# Altium PCB PCB_Interface_Board_7500-0428.PcbDoc (part 4 of 5)
Units mil, origin at the board's own origin, x right, y up, seen from the top; angles counter-clockwise.
Board outline 3850 x 4150 mil, 4 copper layers (Top Layer 1, GND+Signal, PWR+Signal, Bottom Layer 1), stack 62.449 mil thick; 247 components, 137 nets, 1675 pads, 241 vias.
Unrouted connection lines stored in the file: 122.
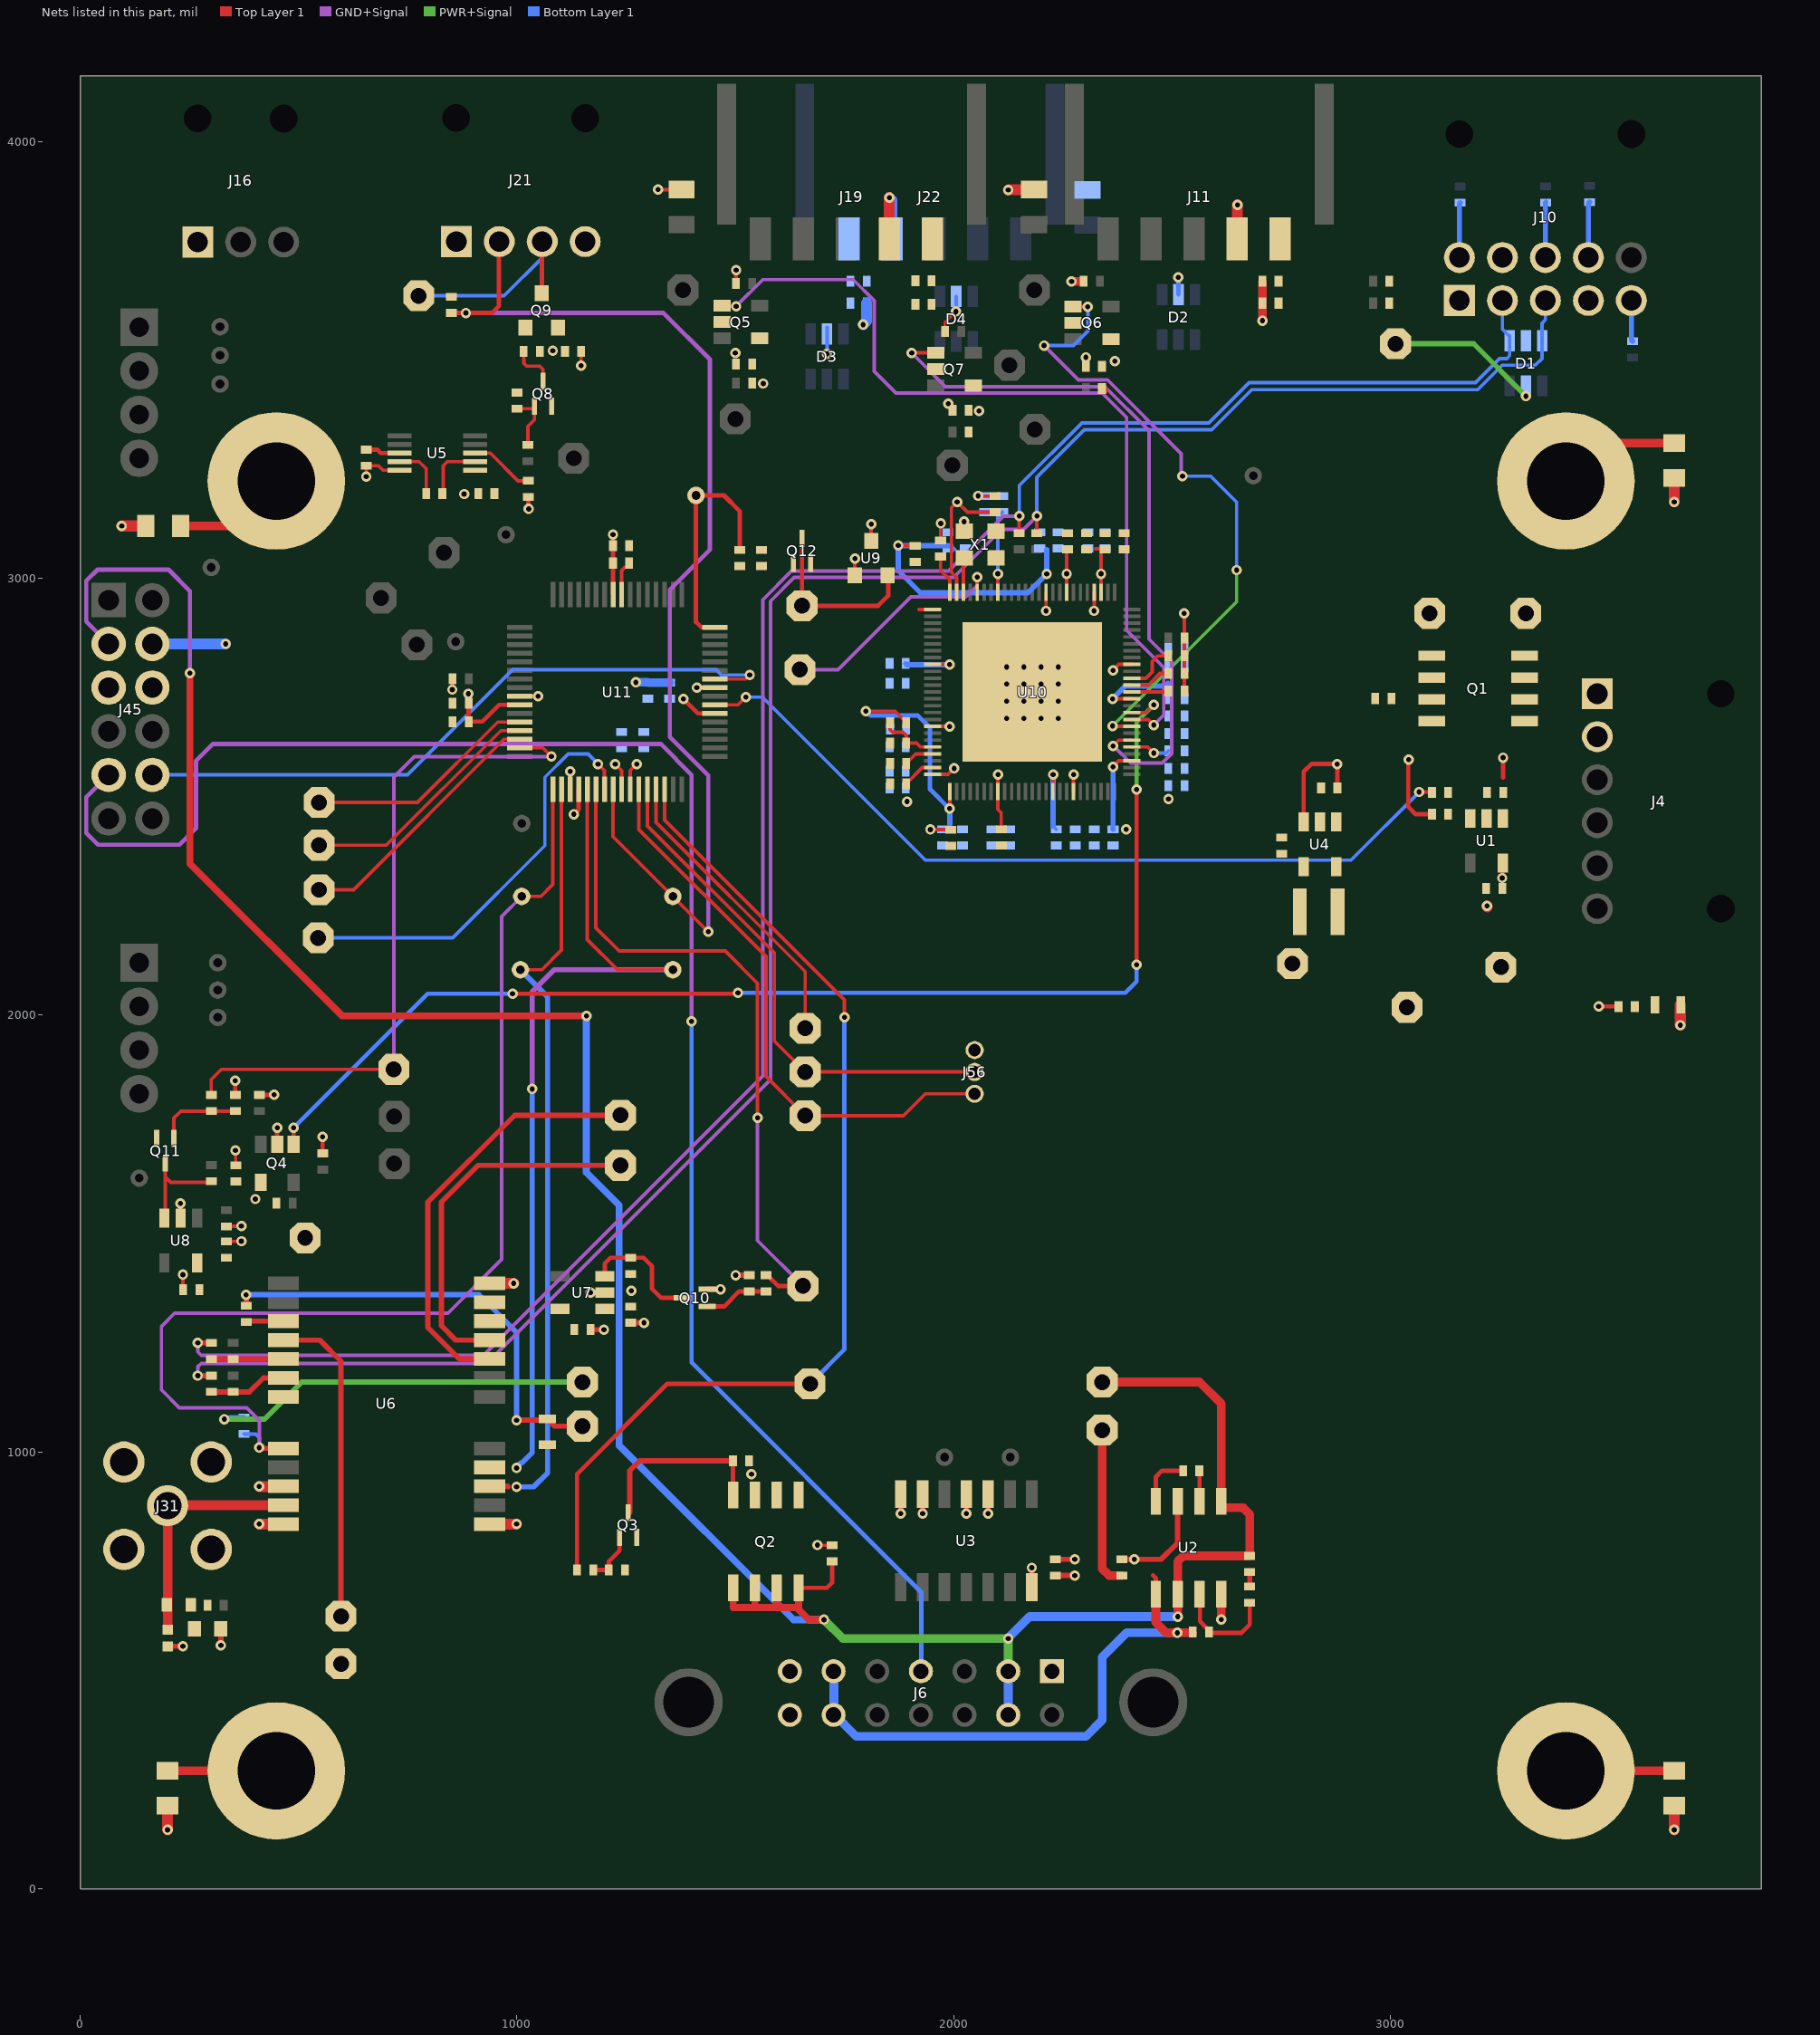
[diagram p4: the nets of this part, all layers, seen from the top]

## Via types
v1: diameter 23.62, hole 11.81, Top Layer 1 to Bottom Layer 1, tented top, 214 vias
v2: diameter 23.62, hole 11.81, Top Layer 1 to Bottom Layer 1, 27 vias

## Nets (pads, with @x,y where several pads share a name; then routed paths per layer and width w, separated by ;. In a path a pad name is that pad's centre, name@x,y a point inside that pad or via, vN(x,y) a via of type N, cw(c..) or ccw(c..) an arc to the next point about the centre after c; other vN are vias at no path point) (continued)
NetJ52_1: (continued)
  Top Layer 1 w8: J52.1@547,2287 625.74,2287 970.47,2631.73 U11.14@1006.77,2631.73
NetL1_1: L1.1 U4.5
NetLED1_1: LED1.1 R3.1
NetMH1_MH: MH1.MH R58.2 | length 248
  Top Layer 1 w20: R58.2@200,270 MH1.MH@448,270
NetMH2_MH: MH2.MH R59.2 | length 248
  Top Layer 1 w20: MH2.MH@3402,270 R59.2@3650,270
NetMH3_MH: MH3.MH R60.2 | length 284
  Top Layer 1 w20: MH3.MH@3402,3223 3489,3310 R60.2@3650,3310
NetMH4_MH: MH4.MH R61.2 | length 261.7
  Top Layer 1 w20: R61.2@230,3120 346,3120 MH4.MH@449,3223
NetQ2_4: Q2.4 Q3.3 R1.1 | length 440.3
  Top Layer 1 w10: Q3.3@1254.72,873.19 1255.72,873.19 1254.81,872.29 Q3.3@1254.81,861.19 ; Q3.3@1255.72,875.68 Q3.3@1258.5,878.46 ; R1.1@1494.6,980 1494.8,979.8 1494.8,900.2 Q2.4@1496,899
  Top Layer 1 w12: Q3.3@1258.5,861.5 1258.5,957.5 1281,980 R1.1@1494.6,980
NetQ3_1: Q3.1 R8.2 R10.2 | length 120.5
  Top Layer 1 w10: R8.2@1174.6,730 R10.2@1210.39,730 1210.39,749.39 1235.13,774.13 Q3.1@1235.13,804.5
NetQ8_1: Q8.1 R25.2 R26.2 | length 138.1
  Top Layer 1 w8: R26.2@1000,3388.35 1033.98,3388.35 Q8.1@1040.13,3394.5 1040.13,3363.13 1025,3348 R25.2@1025,3305.35
NetQ8_3: Q8.3 Q9.1 R23.1 | length 104.8
  Top Layer 1 w8: R23.1@1015.39,3520 1015.39,3492.61 1022,3486 1052,3486 1059.81,3478.19 Q8.3@1059.81,3451.19
NetQ10_1: Q10.1 R33.2 R35.2 | length 148.8
  Top Layer 1 w10: Q10.1@1435.5,1333.13 1474.13,1333.13 1508.61,1367.61 R35.2@1531.81,1367.61 R33.2@1570,1367.61
NetQ10_3: Q10.3 R29.1 U7.3 | length 280.5
  Top Layer 1 w10: U7.3@1201,1402.4 1201,1431 1214.61,1444.61 R29.1@1260,1444.61 1290.39,1444.61 1309,1426 1309,1374 1330.18,1352.82 Q10.3@1378.81,1352.82
NetQ11_1: Q11.1 R34.2 R36.2 | length 193.6
  Top Layer 1 w8: Q11.1@214.37,1718 214.37,1764.37 230.4,1780.4 R34.2@300,1780.4 R36.2@355,1780.4
NetQ11_3: Q11.3 R30.1 U8.3 | length 237.4
  Top Layer 1 w8: U8.3@192.6,1535.18 194.68,1537.27 194.68,1630 ; Q11.3@194.68,1661.31 194.68,1630 ; R30.1@300,1617.61 207.08,1617.61 194.68,1630
NetQ12_1: Q12.1 R45.2 R46.2
NetR2_1: R2.1 R7.2 | length 33
  Top Layer 1 w12: R7.2@2678,692.01 R2.1@2678,725.01
NetR5_2: R5.2 R6.2 U1.3
NetR7_1: R7.1 R9.2 U2.7 | length 237.1
  Top Layer 1 w10: U2.7@2563,674.7 2564,673.7 2564,612.14 R9.2@2580.13,596.01 ; R9.2@2584.6,586 2659,586 2678,605 R7.1@2678,655.01
NetR20_2: R20.2 U5.3 | length 147.7
  Top Layer 1 w8: U5.3@904.61,3287 939.03,3286.98 1002.6,3223.4 R20.2@1026,3223.4
NetR37_1: R37.1 R40.1 U6.6 | length 178.2
  Top Layer 1 w12: R40.1@300,1137.61 R37.1@350,1137.61 387.61,1137.61 419.46,1169.46 U6.6@465,1169.46
NetR38_1: R38.1 R41.1 U6.5 | length 165
  Top Layer 1 w12: R41.1@300,1212.77 U6.5@465,1212.77
NetR39_1: R39.1 U6.3 | length 85.7
  Top Layer 1 w12: R39.1@380,1297.61 381.78,1299.39 U6.3@465,1299.39
NetR44_1: R44.1 U10.100 | length 90.6
  Top Layer 1 w8: R44.1@1970,3049.85 1970,3017.79 1991.02,2996.76 U10.100@1991.02,2968
NetR47_1: R47.1 U10.65 | length 118.6
  Top Layer 1 w8: U10.65@2408,2771.5 2440.28,2771.5 2454.39,2785.61 2454.39,2809.39 2467.6,2822.6 R47.1@2491.5,2822.6
NetR48_1: R48.1 U10.64 | length 94.5
  Top Layer 1 w8: U10.64@2408,2755.75 2445.75,2755.75 2472.21,2782.21 R48.1@2491.5,2782.21
NetR49_1: R49.1 U10.63 | length 84.2
  Top Layer 1 w8: U10.63@2408,2740 2489.69,2740 R49.1@2491.5,2741.81
NetR53_1: R53.1 R55.2 U10.21 | length 140.4
  Top Layer 1 w8: R53.1@1854.5,2670 1854.5,2653.5 1860,2648 1884,2648 1891.5,2640.5 R55.2@1891.5,2623.33 1891.83,2623 1915,2623 1923.98,2614.02 U10.21@1952,2614.02
NetR54_2: R54.2 U10.22 | length 69.4
  Top Layer 1 w8: R54.2@1891.5,2576.67 1913.1,2598.27 U10.22@1952,2598.27
NetR56_2: R56.2 U10.24 | length 75.7
  Top Layer 1 w8: R56.2@1891.5,2530 1928.27,2566.77 U10.24@1952,2566.77
PC_USB2_HOST_DM: D1.1 J10.2 R41.2 R50.2 | length 4858.6
  Top Layer 1 w8: R50.2@2150,3103.5 v1@2150,3141.99
  Top Layer 1 w12: v1(269.19,1249.61) R41.2@300,1249.61
  GND+Signal w8: v1(269.19,1249.61) 269.19,1229.02 277,1221.21 923.46,1221.21 1562.79,1860.54 1562.79,2951 1628.79,3017 1988,3017 2113.5,3142.5 v1(2150.51,3142.5)
  Bottom Layer 1 w8: v1(2150.51,3142.5) 2150.51,3212.73 2293.79,3356 2584.37,3356 2676.37,3448 3194.79,3448 3249.79,3503 3266.25,3503 3273,3509.75 3273,3555 3272,3555 3256.57,3570.43 J10.2@3256.57,3636.15
PC_USB2_HOST_DP: D1.3 J10.3 R40.2 R51.2 | length 4953.7
  Top Layer 1 w8: R51.2@2190,3103.5 v1@2190,3141.99
  Top Layer 1 w12: v1(269.19,1174.61) R40.2@300,1174.61
  GND+Signal w8: v1(269.19,1174.61) 269.19,1195.19 277,1203 931,1203 1581,1853 1581,2948 1635,3002 2000,3002 2110,3112 2160.01,3112 v1(2190.51,3142.5)
  Bottom Layer 1 w8: v1(2190.51,3142.5) 2190.51,3231.51 2299,3340 2591,3340 2683,3432 3200,3432 3256,3488 3332,3488 3347,3503 3347,3584 3355,3592 J10.3@3355,3636.15
PC_VBUS: D1.5 J10.1 J74.1 R11.1 | length 348.1
  PWR+Signal w12: J74.1@3012,3537 3190.63,3537 v1(3310.48,3417.15)
PIC_RA1: J61.1 U11.23 | length 980.7
  Top Layer 1 w8: v1(1185.63,2575) 1200.47,2560.16 U11.23@1200.47,2516.77
  Bottom Layer 1 w8: J61.1@545,2177 853,2177 1064,2388 1064,2544.74 1117.26,2598 1162.63,2598 v1(1185.63,2575)
PIC_RA4: J56.2 J63.1 U11.28 | length 1184.3
  Top Layer 1 w8: U11.28@1298.9,2516.77 1298.9,2433.26 1589.68,2142.48 1589.68,1940.32 J63.1@1660,1870 J56.2@2048,1870
PIC_RA5: J56.1 J64.1 U11.27 | length 1313.2
  Top Layer 1 w8: U11.27@1279.21,2516.77 1279.21,2425.11 1570,2134.32 1570,1860 J64.1@1660,1770 1885,1770 1935,1820 J56.1@2048,1820
PIC_RC1: J65.1 U11.29 | length 688.2
  Top Layer 1 w8: U11.29@1318.58,2516.77 1318.58,2441.42 1660,2100 J65.1@1660,1970
PRT_CTL1: Q4.1 U10.60 | length 2814.5
  Top Layer 1 w8: U10.60@2408,2692.76 2440.62,2692.76 v1(2458.34,2710.48)
  Top Layer 1 w10: Q4.1@488.4,1704.29 v1(488.4,1742) ; v1(990,2049) 1504,2049 v1(1506,2051) ; v2(2419,2115.5) v2(2419,2516.81)
  PWR+Signal w10: v2(2419,2516.81) 2419,2671.13 v1(2458.34,2710.48)
  Bottom Layer 1 w10: v1(488.4,1742) 795.4,2049 v1(990,2049) ; v1(1506,2051) 2393,2051 2419,2077 v2(2419,2115.5)
PRT_CTL2: Q6.1 U10.58 | length 1497.2
  Top Layer 1 w8: Q6.1@2273.71,3622.4 2307.6,3622.4 2308,3622 v1(2307.19,3622) ; v1(2364,2662.1) 2364.84,2661.26 U10.58@2408,2661.26
  GND+Signal w8: v1(2207,3533) 2286,3454 2352.43,3454 2521.01,3285.42 2521.01,3236.99 v1(2524,3234)
  PWR+Signal w8: v1(2364,2662.1) 2648,2946.1 v1(2648,3019)
  Bottom Layer 1 w8: v1(2207,3533) 2274,3533 2307.19,3566.19 v1(2307.19,3622) ; v1(2524,3234) 2588.43,3234 2648,3174.43 v1(2648,3019)
PRT_CTL3: Q5.1 U10.59 | length 1982.1
  Top Layer 1 w8: Q5.1@1469.71,3624.4 1500.6,3624.4 v1(1502,3623) ; U10.59@2408,2677.01 2445.54,2677.01 v1(2458.34,2664.21)
  GND+Signal w8: v1(1502,3623) 1563,3684 1770,3684 1818,3636 1818,3474 1868,3424 2340,3424 2396,3368 2396,2881 2481.15,2795.84 2481.15,2687.02 v1(2458.34,2664.21)
PRT_CTL4: Q7.1 U10.56 | length 1639.7
  Top Layer 1 w8: v1(1904,3516) 1904.4,3516.4 Q7.1@1958.71,3516.4 ; v1@2365,2616.77 2377.99,2629.76 U10.56@2408,2629.76
  GND+Signal w8: v1(1904,3516) 1981,3439 2346.21,3439 2447.19,3338.02 2447.19,2860.83 2499,2809.02 2499,2598.92 2477.37,2577.29 2405.37,2577.29 2366.81,2615.85 v1(2365,2615.85)
PWR_IN_5V: J1.1 J4.1 Q1.5 Q1.6 Q1.7 Q1.8
RB6(PGC)_IB: J45.10 U11.42 | length 1558.5
  Top Layer 1 w8: U11.42@1453.23,2769.53 1523.53,2769.53 v1(1533,2779)
  Bottom Layer 1 w8: J45.10@163,2550 J45.10@165,2550 749,2550 990,2791 1456,2791 1468,2779 v1(1533,2779)
RB6(PGC)_MB: J6.7 J45.9 | length 4026.3
  GND+Signal w10: J45.9@65,2550 13.63,2498.63 13.63,2417.37 41,2390 227,2390 265,2428 265,2582 304,2621 1329,2621 1400,2550 v1(1400,1985.81)
  Bottom Layer 1 w10: v1(1400,1985.81) 1400,1204.94 1926,678.94 1926,509.94 J6.7@1925,508.94